# EAGLE board AC2-EP03-S2 (EAGLE 9.7.0)

Size 268.26 x 236.33 mm. Coordinates in mm from the lower left corner, seen from the top.
Outline: 0,0 268.26,0 268.26,236.33 0,236.33 0,0
Copper layers (1*16): Top 0.035mm / dielectric 1.5mm / Bottom 0.035mm
Design rules "default": minimum track width 6mil, minimum drill 0.35mm, track to track 6mil, track to pad 6mil, pad to pad 6mil, via to via 6mil, smd to smd 6mil, copper to edge 40mil, drill to drill 6mil, minimum pad ring 10mil, minimum via ring 8mil, stop-mask expansion 4mil, vias tented up to drill 0mil, thermal gap 10mil

## Footprints (pad centres in the part's own frame; a part is rotated, then mirrored left to right if it is on the bottom)
LEDRD254W60D565H860B = drill 0.981 pad 1.581: 1 -1.27,0; 2 1.27,0
LEDRD254W60D565H860B_G = drill 0.981 pad 1.581: 1 -1.27,0; 2 1.27,0
LEDRD254W60D565H860B_O = drill 0.981 pad 1.581: 1 -1.27,0; 2 1.27,0
LEDRD254W60D565H860B_Y = drill 0.981 pad 1.581: 1 -1.27,0; 2 1.27,0
7SEG-13 = drill 0.813 long: 1 -5.08,-7.62; 2 -2.54,-7.62; 3 0,-7.62; 4 2.54,-7.62; 5 5.08,-7.62; 6 5.08,7.62; 7 2.54,7.62; 8 0,7.62; 9 -2.54,7.62; 10 -5.08,7.62
1X08 = drill 1.016 long: 1 -8.89,0; 2 -6.35,0; 3 -3.81,0; 4 -1.27,0; 5 1.27,0; 6 3.81,0; 7 6.35,0; 8 8.89,0
RESAD1016W63L850D250B = drill 0.83 pad 1.43: 1 -5.08,0; 2 5.08,0
ARDUINO-UNO-R3-SHIELD = drill 1.016 pad 1.88: 3.3V 24.13,-2.54; 5V 24.13,0; A0 24.13,12.7; A1 24.13,15.24; A2 24.13,17.78; A3 24.13,20.32; A4 24.13,22.86; A5 24.13,25.4; AREF -24.13,-13.97; D2 -24.13,20.32; D3 -24.13,17.78; D4 -24.13,15.24; D5 -24.13,12.7; D6 -24.13,10.16; D7 -24.13,7.62; D8 -24.13,3.81; D9 -24.13,1.27; D10 -24.13,-1.27; D11 -24.13,-3.81; D12 -24.13,-6.35; D13 -24.13,-8.89; GND@0 24.13,2.54; GND@1 24.13,5.08; GND@2 -24.13,-11.43; IOREF 24.13,-7.62; NC 24.13,-10.16; RES 24.13,-5.08; RX -24.13,25.4; SCL -24.13,-19.05; SDA -24.13,-16.51; TX -24.13,22.86; VIN 24.13,7.62

## Placement (x,y rotation side)
D1  RED  [LEDRD254W60D565H860B]  201.24,192.79 180 top
D2  RED  [LEDRD254W60D565H860B]  206.32,192.79 180 top
D3  RED  [LEDRD254W60D565H860B]  211.4,192.79 180 top
D4  RED  [LEDRD254W60D565H860B]  216.48,192.79 180 top
D5  GREEN  [LEDRD254W60D565H860B_G]  224.1,192.79 180 top
D6  GREEN  [LEDRD254W60D565H860B_G]  229.18,192.79 180 top
D7  GREEN  [LEDRD254W60D565H860B_G]  234.26,192.79 180 top
D8  GREEN  [LEDRD254W60D565H860B_G]  239.34,192.79 180 top
D9  ORANGE  [LEDRD254W60D565H860B_O]  262.2,192.79 180 top
D10  ORANGE  [LEDRD254W60D565H860B_O]  246.96,192.79 180 top
D11  ORANGE  [LEDRD254W60D565H860B_O]  252.04,192.79 180 top
D12  ORANGE  [LEDRD254W60D565H860B_O]  257.12,192.79 180 top
D13  YELLOW  [LEDRD254W60D565H860B_Y]  252.04,210.57 180 top
D14  YELLOW  [LEDRD254W60D565H860B_Y]  246.96,210.57 180 top
D15  YELLOW  [LEDRD254W60D565H860B_Y]  262.2,210.57 180 top
D16  YELLOW  [LEDRD254W60D565H860B_Y]  257.12,210.57 180 top
DIGIT1  7SEG-CK  [7SEG-13]  44.69,205.33 0 top
DIGIT2  7SEG-CK  [7SEG-13]  78.9,205.23 0 top
DIGIT7  7SEG-CK  [7SEG-13]  44.07,87.98 0 top
DIGIT8  7SEG-CK  [7SEG-13]  78.28,87.88 0 top
JP1  PINHD-1X08_1X08M  [1X08]  63.96,229.98 180 top
JP4  PINHD-1X08_1X08M  [1X08]  63.34,112.63 180 top
R1  500  [RESAD1016W63L850D250B]  220.29,126.75 90 top
R2  500  [RESAD1016W63L850D250B]  222.83,126.75 90 top
R3  500  [RESAD1016W63L850D250B]  225.37,126.75 90 top
R4  500  [RESAD1016W63L850D250B]  227.91,126.75 90 top
R5  500  [RESAD1016W63L850D250B]  242.13,68.33 90 top
R6  500  [RESAD1016W63L850D250B]  230.45,126.75 90 top
R7  500  [RESAD1016W63L850D250B]  232.99,126.75 90 top
R8  500  [RESAD1016W63L850D250B]  237.05,126.75 90 top
R9  500  [RESAD1016W63L850D250B]  239.59,126.75 90 top
R10  500  [RESAD1016W63L850D250B]  242.13,126.75 90 top
R11  500  [RESAD1016W63L850D250B]  244.67,126.75 90 top
R12  500  [RESAD1016W63L850D250B]  247.21,126.75 90 top
R13  500  [RESAD1016W63L850D250B]  249.75,126.75 90 top
R14  500  [RESAD1016W63L850D250B]  244.67,68.33 90 top
R15  500  [RESAD1016W63L850D250B]  247.21,68.33 90 top
R16  500  [RESAD1016W63L850D250B]  249.75,68.33 90 top
R17  500  [RESAD1016W63L850D250B]  44.7,184.74 90 top
R18  500  [RESAD1016W63L850D250B]  39.62,184.74 90 top
R19  500  [RESAD1016W63L850D250B]  42.16,184.74 90 top
R20  500  [RESAD1016W63L850D250B]  47.24,184.74 90 top
R21  500  [RESAD1016W63L850D250B]  49.78,184.74 90 top
R22  500  [RESAD1016W63L850D250B]  52.32,184.74 90 top
R23  500  [RESAD1016W63L850D250B]  56.38,184.74 90 top
R24  500  [RESAD1016W63L850D250B]  58.92,184.74 90 top
R25  500  [RESAD1016W63L850D250B]  61.46,184.74 90 top
R26  500  [RESAD1016W63L850D250B]  64,184.74 90 top
R27  500  [RESAD1016W63L850D250B]  66.54,184.74 90 top
R28  500  [RESAD1016W63L850D250B]  69.08,184.74 90 top
R29  500  [RESAD1016W63L850D250B]  61.46,126.32 90 top
R30  500  [RESAD1016W63L850D250B]  64,126.32 90 top
R59  500  [RESAD1016W63L850D250B]  44.08,67.39 90 top
R60  500  [RESAD1016W63L850D250B]  38.99,67.39 90 top
R61  500  [RESAD1016W63L850D250B]  41.53,67.39 90 top
R62  500  [RESAD1016W63L850D250B]  46.62,67.39 90 top
R63  500  [RESAD1016W63L850D250B]  49.16,67.39 90 top
R64  500  [RESAD1016W63L850D250B]  51.7,67.39 90 top
R65  500  [RESAD1016W63L850D250B]  55.76,67.39 90 top
R66  500  [RESAD1016W63L850D250B]  58.3,67.39 90 top
R67  500  [RESAD1016W63L850D250B]  60.84,67.39 90 top
R68  500  [RESAD1016W63L850D250B]  63.38,67.39 90 top
R69  500  [RESAD1016W63L850D250B]  65.92,67.39 90 top
R70  500  [RESAD1016W63L850D250B]  68.46,67.39 90 top
R71  500  [RESAD1016W63L850D250B]  60.84,8.97 90 top
R72  500  [RESAD1016W63L850D250B]  63.38,8.97 90 top
UARDUINODEEXIBICAO1  ARDUINO-UNO-R3-SHIELD  [ARDUINO-UNO-R3-SHIELD]  48.51,155.53 270 top
UARDUINODEEXIBICAO2  ARDUINO-UNO-R3-SHIELD  [ARDUINO-UNO-R3-SHIELD]  47.88,38.18 270 top
UARDUINODELOGICA  ARDUINO-UNO-R3-SHIELD  [ARDUINO-UNO-R3-SHIELD]  229.18,97.54 270 top

## Library data of the parts
D1-D4 = Tinkercad; CATEGORY: Opto-Electronic; SUB-CATEGORY: LED; VALUE: LED_RED
D5-D8 = Tinkercad; CATEGORY: Opto-Electronic; SUB-CATEGORY: LED; VALUE: LED_GREEN
D9-D12 = Tinkercad; CATEGORY: Opto-Electronic; SUB-CATEGORY: LED; VALUE: LED_ORANGE
D13-D16 = Tinkercad; CATEGORY: Opto-Electronic; SUB-CATEGORY: LED; VALUE: LED_YELLOW
DIGIT1 DIGIT2 DIGIT7 DIGIT8 = Tinkercad; CATEGORY: Opto-Electronic; SUB-CATEGORY: Display; TYPE: 7-Segment
JP1 JP4 R1-R30 R59-R72 UARDUINODEEXIBICAO1 UARDUINODEEXIBICAO2 UARDUINODELOGICA = Tinkercad

## Nets
D1_A: D1.1 R6.2
D2_A: D2.1 R7.2
D3_A: D3.1 R8.2
D4_A: D4.1 R9.2
D5_A: D5.1 R10.2
D6_A: D6.1 R11.2
D7_A: D7.1 R12.2
D8_A: D8.1 R13.2
D9_A: D9.1 R5.1
D10_A: D10.1 R16.1
D11_A: D11.1 R15.1
D12_A: D12.1 R14.1
D13_A: D13.1 R2.2
D14_A: D14.1 R1.2
D15_A: D15.1 R4.2
D16_A: D16.1 R3.2
DIGIT1_A: DIGIT1.7 R21.2
DIGIT1_B: DIGIT1.6 R20.2
DIGIT1_C: DIGIT1.4 R17.2
DIGIT1_D: DIGIT1.2 R19.2
DIGIT1_E: DIGIT1.1 R18.2
DIGIT1_F: DIGIT1.9 R22.2
DIGIT1_G: DIGIT1.10 R23.2
DIGIT2_A: DIGIT2.7 R29.1
DIGIT2_B: DIGIT2.6 R30.1
DIGIT2_C: DIGIT2.4 R28.2
DIGIT2_D: DIGIT2.2 R27.2
DIGIT2_E: DIGIT2.1 R26.2
DIGIT2_F: DIGIT2.9 R24.2
DIGIT2_G: DIGIT2.10 R25.2
DIGIT7_A: DIGIT7.7 R63.2
DIGIT7_B: DIGIT7.6 R62.2
DIGIT7_C: DIGIT7.4 R59.2
DIGIT7_D: DIGIT7.2 R61.2
DIGIT7_E: DIGIT7.1 R60.2
DIGIT7_F: DIGIT7.9 R64.2
DIGIT7_G: DIGIT7.10 R65.2
DIGIT8_A: DIGIT8.7 R71.1
DIGIT8_B: DIGIT8.6 R72.1
DIGIT8_C: DIGIT8.4 R70.2
DIGIT8_D: DIGIT8.2 R69.2
DIGIT8_E: DIGIT8.1 R68.2
DIGIT8_F: DIGIT8.9 R66.2
DIGIT8_G: DIGIT8.10 R67.2
UARDUINODEEXIBICAO1_A0: R29.2 UARDUINODEEXIBICAO1.A0
UARDUINODEEXIBICAO1_A1: R30.2 UARDUINODEEXIBICAO1.A1
UARDUINODEEXIBICAO1_D2: R28.1 UARDUINODEEXIBICAO1.D2
UARDUINODEEXIBICAO1_D3: R27.1 UARDUINODEEXIBICAO1.D3
UARDUINODEEXIBICAO1_D4: R26.1 UARDUINODEEXIBICAO1.D4
UARDUINODEEXIBICAO1_D5: R25.1 UARDUINODEEXIBICAO1.D5
UARDUINODEEXIBICAO1_D6: R24.1 UARDUINODEEXIBICAO1.D6
UARDUINODEEXIBICAO1_D7: R23.1 UARDUINODEEXIBICAO1.D7
UARDUINODEEXIBICAO1_D8: R22.1 UARDUINODEEXIBICAO1.D8
UARDUINODEEXIBICAO1_D9: R21.1 UARDUINODEEXIBICAO1.D9
UARDUINODEEXIBICAO1_D10: R20.1 UARDUINODEEXIBICAO1.D10
UARDUINODEEXIBICAO1_D11: R17.1 UARDUINODEEXIBICAO1.D11
UARDUINODEEXIBICAO1_D12: R19.1 UARDUINODEEXIBICAO1.D12
UARDUINODEEXIBICAO1_D13: R18.1 UARDUINODEEXIBICAO1.D13
UARDUINODEEXIBICAO1_GND: D1.2 D2.2 D3.2 D4.2 D5.2 D6.2 D7.2 D8.2 D9.2 D10.2 D11.2 D12.2 D13.2 D14.2 D15.2 D16.2 DIGIT1.5 DIGIT1.8 DIGIT2.8 DIGIT7.5 DIGIT7.8 DIGIT8.8 JP1.1 JP1.2 JP1.3 JP1.4 JP1.5 JP1.6 JP1.7 JP1.8 JP4.1 JP4.2 JP4.3 JP4.4 JP4.5 JP4.6 JP4.7 JP4.8 UARDUINODEEXIBICAO1.GND@0 UARDUINODEEXIBICAO1.GND@1 UARDUINODEEXIBICAO1.GND@2 UARDUINODEEXIBICAO2.GND@0 UARDUINODEEXIBICAO2.GND@1 UARDUINODEEXIBICAO2.GND@2 UARDUINODELOGICA.GND@0 UARDUINODELOGICA.GND@1 UARDUINODELOGICA.GND@2
UARDUINODEEXIBICAO2_A0: R71.2 UARDUINODEEXIBICAO2.A0
UARDUINODEEXIBICAO2_A1: R72.2 UARDUINODEEXIBICAO2.A1
UARDUINODEEXIBICAO2_A4: UARDUINODEEXIBICAO1.A4 UARDUINODEEXIBICAO2.A4 UARDUINODELOGICA.A4
UARDUINODEEXIBICAO2_A5: UARDUINODEEXIBICAO1.A5 UARDUINODEEXIBICAO2.A5 UARDUINODELOGICA.A5
UARDUINODEEXIBICAO2_D2: R70.1 UARDUINODEEXIBICAO2.D2
UARDUINODEEXIBICAO2_D3: R69.1 UARDUINODEEXIBICAO2.D3
UARDUINODEEXIBICAO2_D4: R68.1 UARDUINODEEXIBICAO2.D4
UARDUINODEEXIBICAO2_D5: R67.1 UARDUINODEEXIBICAO2.D5
UARDUINODEEXIBICAO2_D6: R66.1 UARDUINODEEXIBICAO2.D6
UARDUINODEEXIBICAO2_D7: R65.1 UARDUINODEEXIBICAO2.D7
UARDUINODEEXIBICAO2_D8: R64.1 UARDUINODEEXIBICAO2.D8
UARDUINODEEXIBICAO2_D9: R63.1 UARDUINODEEXIBICAO2.D9
UARDUINODEEXIBICAO2_D10: R62.1 UARDUINODEEXIBICAO2.D10
UARDUINODEEXIBICAO2_D11: R59.1 UARDUINODEEXIBICAO2.D11
UARDUINODEEXIBICAO2_D12: R61.1 UARDUINODEEXIBICAO2.D12
UARDUINODEEXIBICAO2_D13: R60.1 UARDUINODEEXIBICAO2.D13
UARDUINODELOGICA_A0: R5.2 UARDUINODELOGICA.A0
UARDUINODELOGICA_A1: R14.2 UARDUINODELOGICA.A1
UARDUINODELOGICA_A2: R15.2 UARDUINODELOGICA.A2
UARDUINODELOGICA_A3: R16.2 UARDUINODELOGICA.A3
UARDUINODELOGICA_D2: R13.1 UARDUINODELOGICA.D2
UARDUINODELOGICA_D3: R12.1 UARDUINODELOGICA.D3
UARDUINODELOGICA_D4: R11.1 UARDUINODELOGICA.D4
UARDUINODELOGICA_D5: R10.1 UARDUINODELOGICA.D5
UARDUINODELOGICA_D6: R9.1 UARDUINODELOGICA.D6
UARDUINODELOGICA_D7: R8.1 UARDUINODELOGICA.D7
UARDUINODELOGICA_D8: R7.1 UARDUINODELOGICA.D8
UARDUINODELOGICA_D9: R6.1 UARDUINODELOGICA.D9
UARDUINODELOGICA_D10: R4.1 UARDUINODELOGICA.D10
UARDUINODELOGICA_D11: R3.1 UARDUINODELOGICA.D11
UARDUINODELOGICA_D12: R2.1 UARDUINODELOGICA.D12
UARDUINODELOGICA_D13: R1.1 UARDUINODELOGICA.D13

## Tracks (layer width: path | path; a pad name or v marks a point on that pad's centre or on a via)
D1_A  (1 unrouted)
D2_A  (1 unrouted)
D3_A  (1 unrouted)
D4_A  (1 unrouted)
D5_A  (1 unrouted)
D6_A  (1 unrouted)
D7_A  (1 unrouted)
D8_A  (1 unrouted)
D9_A  (1 unrouted)
D10_A  (1 unrouted)
D11_A  (1 unrouted)
D12_A  (1 unrouted)
D13_A  (1 unrouted)
D14_A  (1 unrouted)
D15_A  (1 unrouted)
D16_A  (1 unrouted)
DIGIT1_A  (1 unrouted)
DIGIT1_B  (1 unrouted)
DIGIT1_C  (1 unrouted)
DIGIT1_D  (1 unrouted)
DIGIT1_E  (1 unrouted)
DIGIT1_F  (1 unrouted)
DIGIT1_G  (1 unrouted)
DIGIT2_A  (1 unrouted)
DIGIT2_B  (1 unrouted)
DIGIT2_C  (1 unrouted)
DIGIT2_D  (1 unrouted)
DIGIT2_E  (1 unrouted)
DIGIT2_F  (1 unrouted)
DIGIT2_G  (1 unrouted)
DIGIT7_A  (1 unrouted)
DIGIT7_B  (1 unrouted)
DIGIT7_C  (1 unrouted)
DIGIT7_D  (1 unrouted)
DIGIT7_E  (1 unrouted)
DIGIT7_F  (1 unrouted)
DIGIT7_G  (1 unrouted)
DIGIT8_A  (1 unrouted)
DIGIT8_B  (1 unrouted)
DIGIT8_C  (1 unrouted)
DIGIT8_D  (1 unrouted)
DIGIT8_E  (1 unrouted)
DIGIT8_F  (1 unrouted)
DIGIT8_G  (1 unrouted)
UARDUINODEEXIBICAO1_A0  (1 unrouted)
UARDUINODEEXIBICAO1_A1  (1 unrouted)
UARDUINODEEXIBICAO1_D2  (1 unrouted)
UARDUINODEEXIBICAO1_D3  (1 unrouted)
UARDUINODEEXIBICAO1_D4  (1 unrouted)
UARDUINODEEXIBICAO1_D5  (1 unrouted)
UARDUINODEEXIBICAO1_D6  (1 unrouted)
UARDUINODEEXIBICAO1_D7  (1 unrouted)
UARDUINODEEXIBICAO1_D8  (1 unrouted)
UARDUINODEEXIBICAO1_D9  (1 unrouted)
UARDUINODEEXIBICAO1_D10  (1 unrouted)
UARDUINODEEXIBICAO1_D11  (1 unrouted)
UARDUINODEEXIBICAO1_D12  (1 unrouted)
UARDUINODEEXIBICAO1_D13  (1 unrouted)
UARDUINODEEXIBICAO1_GND  (46 unrouted)
UARDUINODEEXIBICAO2_A0  (1 unrouted)
UARDUINODEEXIBICAO2_A1  (1 unrouted)
UARDUINODEEXIBICAO2_A4  (2 unrouted)
UARDUINODEEXIBICAO2_A5  (2 unrouted)
UARDUINODEEXIBICAO2_D2  (1 unrouted)
UARDUINODEEXIBICAO2_D3  (1 unrouted)
UARDUINODEEXIBICAO2_D4  (1 unrouted)
UARDUINODEEXIBICAO2_D5  (1 unrouted)
UARDUINODEEXIBICAO2_D6  (1 unrouted)
UARDUINODEEXIBICAO2_D7  (1 unrouted)
UARDUINODEEXIBICAO2_D8  (1 unrouted)
UARDUINODEEXIBICAO2_D9  (1 unrouted)
UARDUINODEEXIBICAO2_D10  (1 unrouted)
UARDUINODEEXIBICAO2_D11  (1 unrouted)
UARDUINODEEXIBICAO2_D12  (1 unrouted)
UARDUINODEEXIBICAO2_D13  (1 unrouted)
UARDUINODELOGICA_A0  (1 unrouted)
UARDUINODELOGICA_A1  (1 unrouted)
UARDUINODELOGICA_A2  (1 unrouted)
UARDUINODELOGICA_A3  (1 unrouted)
UARDUINODELOGICA_D2  (1 unrouted)
UARDUINODELOGICA_D3  (1 unrouted)
UARDUINODELOGICA_D4  (1 unrouted)
UARDUINODELOGICA_D5  (1 unrouted)
UARDUINODELOGICA_D6  (1 unrouted)
UARDUINODELOGICA_D7  (1 unrouted)
UARDUINODELOGICA_D8  (1 unrouted)
UARDUINODELOGICA_D9  (1 unrouted)
UARDUINODELOGICA_D10  (1 unrouted)
UARDUINODELOGICA_D11  (1 unrouted)
UARDUINODELOGICA_D12  (1 unrouted)
UARDUINODELOGICA_D13  (1 unrouted)